# Altium PCB avr32da32_evalboard.PcbDoc
Units mil, origin at the board's own origin, x right, y up, seen from the top; angles counter-clockwise.
Board outline 1275 x 2985 mil, 2 copper layers (Top Layer, Bottom Layer); 39 components, 52 nets, 199 pads, 18 vias.
Unrouted connection lines stored in the file: 6.
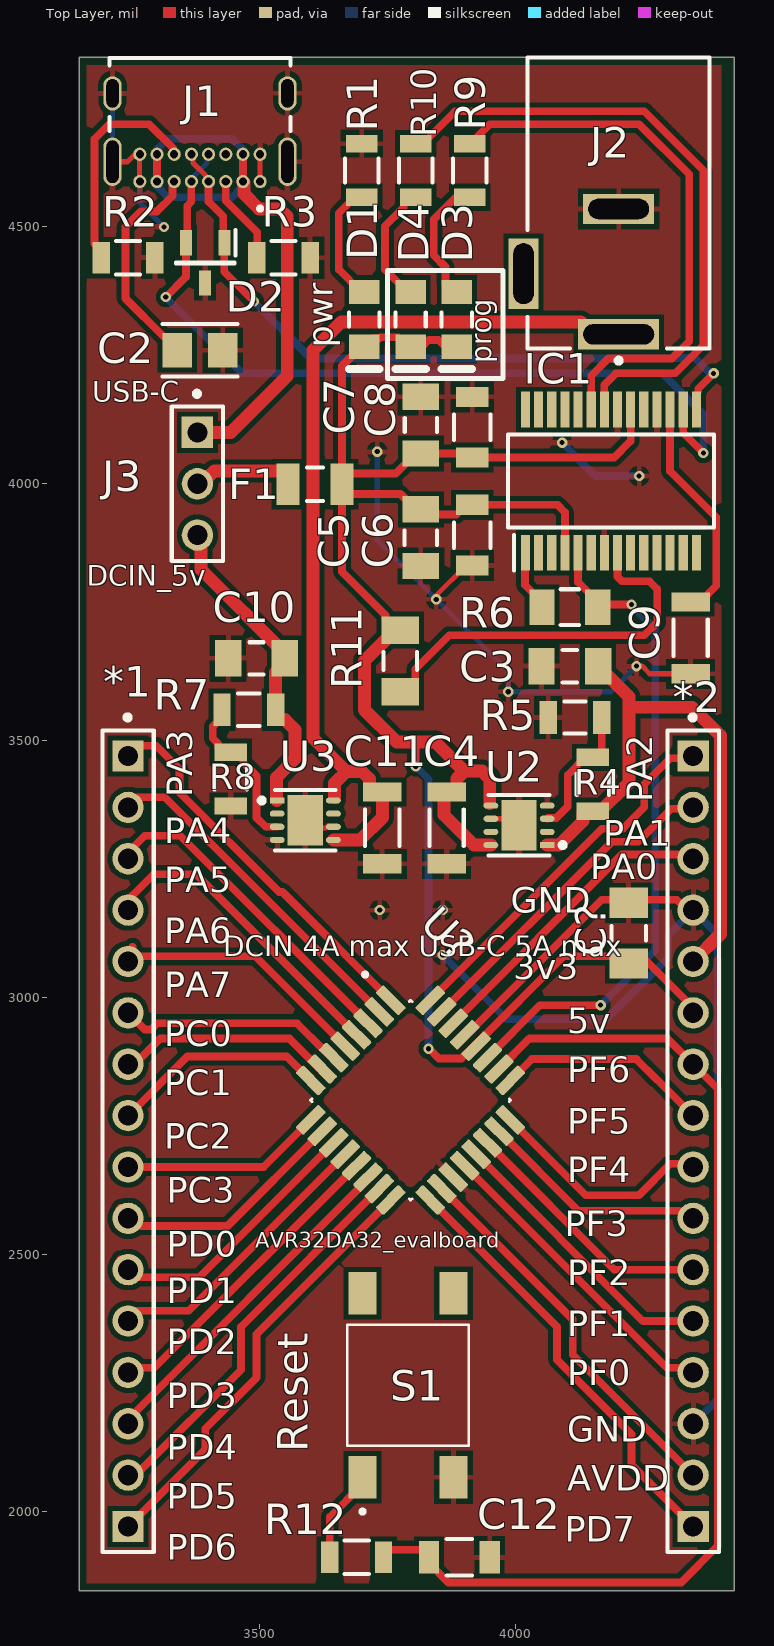
[diagram p0: Top Layer view]
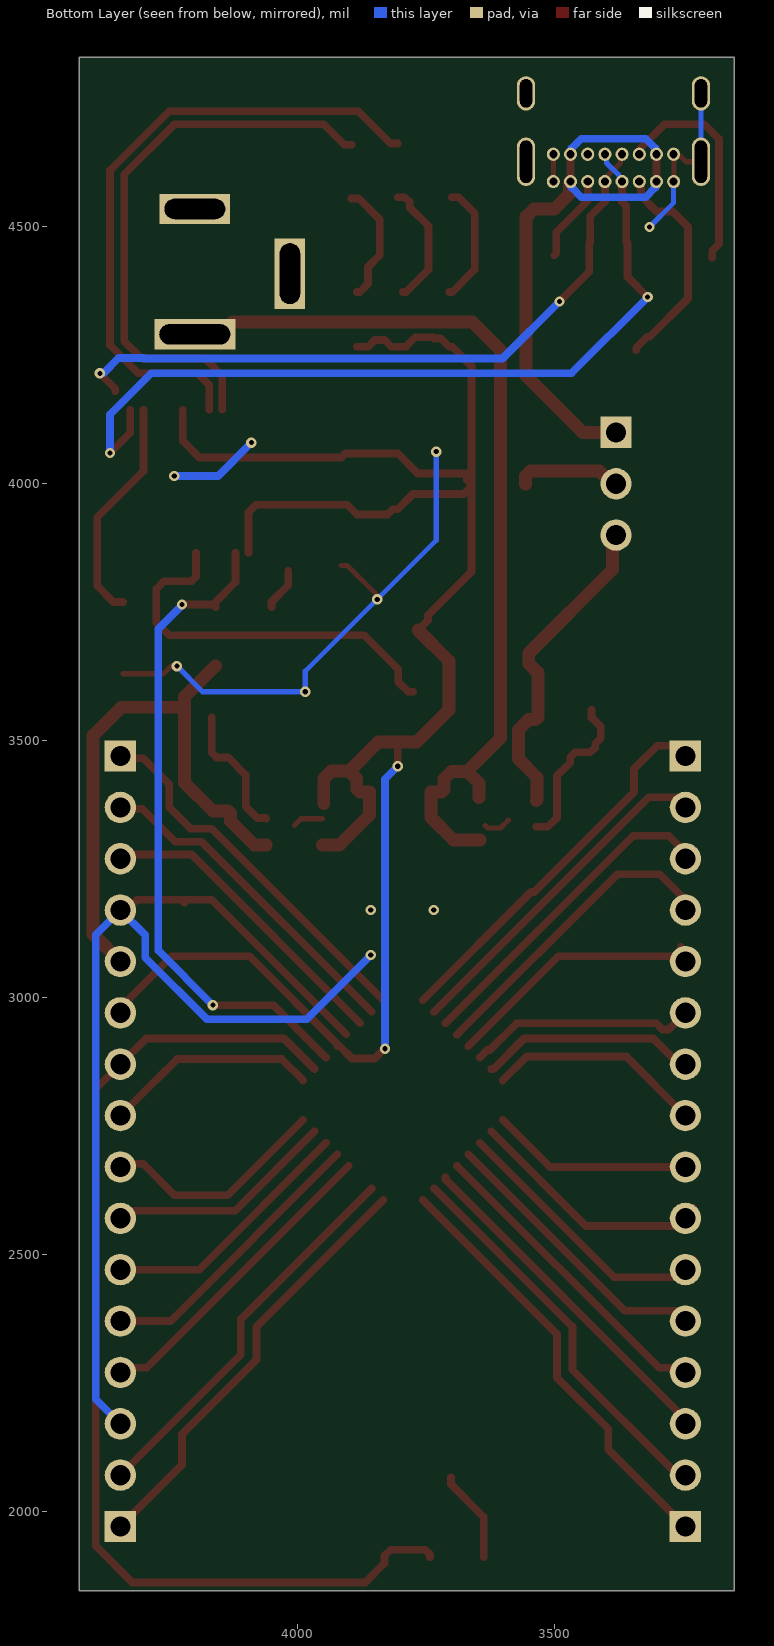
[diagram p1: Bottom Layer view, seen from below]

## Layer stack, top to bottom
Top Solder: solder mask 0.4, Solder Resist, Dk 3.5
Top Layer: signal copper 1.4
Dielectric 1: dielectric 12.6, FR-4, Dk 4.8
Bottom Layer: signal copper 1.4
Bottom Solder: solder mask 0.4, Solder Resist, Dk 3.5

## Board outline
3150,1845 4425,1845 4425,4830 3150,4830

## Design rules (kind name [scope] priority, off if disabled: settings)
Clearance [All] p1: gap=10 ignorepadtopadclearanceinfootprint=FALSE
PolygonConnect [All] p1: connectstyle=Relief reliefconductorwidth=10 reliefentries=4 polygonreliefangle="90 Angle" airgapwidth=10
RoutingVias [All] p1: holewidth=28 width=50 viastyle="Through Hole" minholewidth=28 minwidth=50 maxholewidth=28 maxwidth=50
SolderMaskExpansion [All] p1: expansion=4 istentingtop=FALSE
SupplyNets "Schematic Supply Nets_5" [InNet('VIN')] p1: voltage=0.000
SupplyNets "Schematic Supply Nets_4" [InNet('+5')] p2: voltage=0.000
SupplyNets "Schematic Supply Nets_3" [InNet('+3v3')] p3: voltage=0.000
SupplyNets "Schematic Supply Nets_2" [InNet('VBUS')] p4: voltage=0.000
SupplyNets "Schematic Supply Nets_1" [InNet('VCC')] p5: voltage=0.000
SupplyNets "Schematic Supply Nets" [InNet('GND')] p6: voltage=0.000
Width [All] p1: maxlimit=25 minlimit=10 preferedwidth=15 minimp=50.000000 maximp=50.000000 favimp=50.000000
30 further rules are at their usual default settings.

## Components (designator, comment, footprint, x,y, rotation, side; value= is the part's Value field where it differs from the comment)
*1 "Custom Connector_16" "Custom Connector_16" 3245,2770 r270 top
*2 "Custom Connector_16" "Custom Connector_16" 4345,2770 r270 top
C2 "10nF" FP-GR331B-0_2-IPC_C 3385,4260 r0 top
C3 "Capacitor 10 uF +/- 10% 16 V 1206" CAPC3216X180X50NL20T25 4105,3645 r180 top value=10µF
C4 "Capacitor 1 uF +/- 10% 25 V 1206" CAPC3216X180X20ML20 3865,3330 r90 top value=1µF
C5 "Capacitor 10 uF +/- 10% 16 V 1206" CAPC3216X180X50NL20T25 3815,3895 r270 top value=10µF
C6 "100nF" FP-1206-L_3_2_0_2-W_1_6_0-MFG 3915,3900 r270 top
C7 "Capacitor 10 uF +/- 10% 16 V 1206" CAPC3216X180X50NL20T25 3815.12,4114.15 r90 top value=10µF
C8 "100nF" FP-1206-L_3_2_0_2-W_1_6_0-MFG 3915,4110 r90 top
C9 "Capacitor 1 uF +/- 10% 25 V 1206" CAPC3216X180X20ML20 4340,3700 r270 top value=1µF
C10 "Capacitor 10 uF +/- 10% 16 V 1206" CAPC3216X180X50NL20T25 3495,3660 r180 top value=10µF
C11 "Capacitor 1 uF +/- 10% 25 V 1206" CAPC3216X180X20ML20 3740,3330 r90 top value=1µF
C12 "100nF" FP-1206-L_3_2_0_2-W_1_6_0-MFG 3890,1910 r0 top
C? "Capacitor 10 uF +/- 10% 16 V 1206" CAPC3216X180X50ML20T25 4220,3125 r270 top value=100nF (schematic designator C1)
D1 "SMLLX1206ICTR" LUMX-SML-LX1206IC_V 3705,4320 r270 top
D2 "CDSOT23-SM712" SOT95P230X117-3N 3395,4430 r270 top
D3 "SMLLX1206ICTR" LUMX-SML-LX1206IC_V 3885,4320 r270 top
D4 "SMLLX1206ICTR" LUMX-SML-LX1206IC_V 3795,4320 r270 top
F1 "0466001.NR" FP-0466-MFG 3608.98,3998.98 r0 top
IC1 "CY7C65213-28PVXI" SOP65P780X200-28N 4185,4005 r90 top
J1 "USB4085-GF-A_REVB" GCT_USB4085-GF-A_REVB 3385,4760 r180 top
J2 "PJ-002A" CUI-PJ-002A_V 4200,4409.02 r90 top
J3 "90120-0763" FP-90120-0763-MFG 3380,4000 r270 top
R1 "CR1206-JW-151ELF" FP-CR1206-IPC_C 3700,4610 r270 top value=150
R2 "CR1206-JW-151ELF" FP-CR1206-IPC_C 3245,4440 r0 top value=5.1k
R3 "CR1206-JW-151ELF" FP-CR1206-IPC_C 3547.76,4440 r0 top value=5.1k
R4 "RT1206DRD07499KL" FP-RT1206-IPC_C 4150,3415 r270 top value=499k
R5 "RT1206FRE07160KL" FP-RT1206-IPC_C 4115,3545 r0 top value=160k
R6 "MCA1206MD1001BP100" FP-MCA1206-IPC_B 4105,3760 r0 top value=1k
R7 "RT1206DRD07499KL" FP-RT1206-IPC_C 3480,3560 r0 top value=835k
R8 "RT1206FRE07160KL" FP-RT1206-IPC_C 3445,3425 r90 top value=160k
R9 "CR1206-JW-151ELF" FP-CR1206-IPC_C 3910,4610 r270 top value=150
R10 "CR1206-JW-151ELF" FP-CR1206-IPC_C 3805,4610 r270 top value=150
R11 "Resistor 10k +/-1% 1206 250 mW" RESC3216X60X45ML15T20 3775,3655 r90 top value=10k
R12 "CR1206-JW-151ELF" FP-CR1206-IPC_C 3690,1910 r180 top value=150
S1 "TS04-66-43-BK-100-SMT" SW_TS04-66-43-BK-100-SMT 3790,2245 r90 top
U2 "TLV76601QWDRBRQ1" FP-DRB0008J-IPC_C 4006.13,3335.04 r180 top
U3 "TLV76601QWDRBRQ1" FP-DRB0008J-IPC_C 3590,3345 r0 top
U? "AVR32DA32-I/PT" QFP80P900X900X120-32N 3795,2800 r315 top

## Footprints (in the part's own frame and the unit in brackets; to place one, negate y for a bottom-side part, rotate by r counter-clockwise, add the part's x,y. Pads: shape width x height; smd on the part's side, far side on the other; paste and mask are expansions set on the pad)
CAPC3216X180X20ML20 [mm] "Chip Capacitor, 2-Leads, Body 3.40x1.80mm, IPC Low Density"
  rect 0.95x1.9 smd: 1(-1.775,0) 2(1.775,0)
  silkscreen extent -0.9,-0.85 0.9,0.85, body extent -1.7,-0.9 1.7,0.9, height 1.8
CAPC3216X180X50ML20T25 [mm] "Chip Capacitor, 2-Leads, Body 3.40x1.80mm, IPC Low Density"
  rect 1.5x1.9 smd: 1(-1.5,0) 2(1.5,0)
  silkscreen extent -0.35,-0.85 0.35,0.85, body extent -1.7,-0.9 1.7,0.9, height 1.8
CAPC3216X180X50NL20T25 [mm] "Chip Capacitor, 2-Leads, Body 3.40x1.80mm, IPC Medium Density"
  rect 1.3x1.8 smd: 1(-1.4,0) 2(1.4,0)
  silkscreen extent -0.35,-0.8 0.35,0.8, body extent -1.7,-0.9 1.7,0.9, height 1.8
CUI-PJ-002A_V [mm] "THD, 3-Leads, Body 14.4x9mm, Height 11mm"
  rect 1.5x4 hole 1 slot 3.5 at 90 deg: 1(-3,0)
  rect 1.5x3.5 hole 1 slot 3 at 90 deg: 2(3.2,0)
  rect 3.5x1.5 hole 1 slot 3 at 0 deg: 3(0,4.7)
  silkscreen extent -4.42,-4.5 10.7,4.5, body extent -3.7,-4.5 10.7,4.9, height 11
"Custom Connector_16" [mm]
  rect 1.55x1.55 hole 1 paste-2539.97 mask+0: 1(-17.78,0) 16(20.32,0)
  round 1.55 hole 1 paste-2539.97 mask+0: 2(-15.24,0) 3(-12.7,0) 5(-7.62,0) 6(-5.08,0) 7(-2.54,0) 8(0,0) 9(2.54,0) 11(7.62,0) 12(10.16,0) 13(12.7,0) 14(15.24,0) 15(17.78,0)
  round 1.55 hole 1 paste-2539.97 mask-2539.97: 4(-10.16,0) 10(5.08,0)
  silkscreen extent -19.81,-1.27 21.59,1.27, body extent -19.15,-1.37 19.15,1.37, height 0.25
FP-0466-MFG [mil]
  rect 45x80 smd paste+0 mask+0: 1(-52.5,0) 2(52.5,0)
  silkscreen extent -15,-32 15,32, body extent -79,-44 79,44, height 10
FP-1206-L_3_2_0_2-W_1_6_0-MFG [mm]
  rect 1x1.6 smd paste+0 mask+0: 1(-1.5,0) 2(1.5,0)
  silkscreen extent -0.63,-0.9 0.63,0.9, body extent -2.1,-1 2.1,1, height 0.25
FP-90120-0763-MFG [mm]
  rect 1.55x1.55 hole 1 paste-2539.97 mask+0: 1(-2.54,0)
  round 1.55 hole 1 paste-2539.97 mask+0: 2(0,0) 3(2.54,0)
  silkscreen extent -4.57,-1.27 3.81,1.27, body extent -3.91,-1.37 3.91,1.37, height 0.25
FP-CR1206-IPC_C [mil]
  rect 33.79x61.5 smd paste+0 mask+0: 1(-52.24,0) 2(52.24,0)
  silkscreen extent -24,-32 24,32, body extent -73,-36 73,36, height 10
FP-DRB0008J-IPC_C [mm]
  rect 0.731x0.302 smd paste+0 mask+0: 1(-1.391,0.975)
  rrect100% 0.731x0.302 smd paste+0 mask+0: 2(-1.391,0.325) 3(-1.391,-0.325) 4(-1.391,-0.975) 5(1.391,-0.975) 6(1.391,-0.325) 7(1.391,0.325) 8(1.391,0.975)
  rect 1.75x2.5 smd paste-1000 mask+0: 9(0,0)
  silkscreen extent -2.28,-1.5 1.5,1.5, body extent -1.86,-1.6 1.86,1.6, height 0.25
FP-GR331B-0_2-IPC_C [mil]
  rect 57.25x67.17 smd paste+0 mask+0: 1(-44.33,0) 2(44.33,0)
  silkscreen extent -73,-51 73,51, body extent -77,-39 77,39, height 10
FP-MCA1206-IPC_B [mil]
  rect 49.44x69.22 smd paste+0 mask+0: 1(-54.18,0) 2(54.18,0)
  silkscreen extent -18,-35 18,35, body extent -89,-44 89,44, height 10
FP-RT1206-IPC_C [mil]
  rect 33.79x63.47 smd paste+0 mask+0: 1(-52.24,0) 2(52.24,0)
  silkscreen extent -21,-31 21,31, body extent -73,-37 73,37, height 10
GCT_USB4085-GF-A_REVB [mm]
  round 0.65 hole 0.4: A1(-2.975,4.36) A4(-2.125,4.36) A5(-1.275,4.36) A6(-0.425,4.36) A7(0.425,4.36) A8(1.275,4.36) A9(2.125,4.36) A12(2.975,4.36) B1(2.975,3.01) B4(2.125,3.01) B5(1.275,3.01) B6(0.425,3.01) B7(-0.425,3.01) B8(-1.275,3.01) B9(-2.125,3.01) B12(-2.975,3.01)
  oval 0.9x1.7 hole 0.6 slot 1.4 at 90 deg: S1(-4.325,0) S2(4.325,0)
  oval 0.9x2.4 hole 0.6 slot 2.1 at 90 deg: S3(-4.325,3.38) S4(4.325,3.38)
  silkscreen extent -4.47,-1.74 4.47,5.8, body extent -4.47,-4.25 4.47,4.92, height 3.46
LUMX-SML-LX1206IC_V [mm] "SMD, 2-Leads, Body 3.2x1.5mm"
  rect 1.2x1.5 smd: 1(-1.35,0) 2(1.35,0)
  silkscreen extent -0.35,-0.75 2.45,0.75, body extent -1.6,-0.8 1.6,0.8, height 1.1
QFP80P900X900X120-32N [mm]
  rrect25% 1.6x0.55 smd: 1(-4.18,2.8) 2(-4.18,2) 3(-4.18,1.2) 4(-4.18,0.4) 5(-4.18,-0.4) 6(-4.18,-1.2) 7(-4.18,-2) 8(-4.18,-2.8) 17(4.18,-2.8) 18(4.18,-2) 19(4.18,-1.2) 20(4.18,-0.4) 21(4.18,0.4) 22(4.18,1.2) 23(4.18,2) 24(4.18,2.8)
  rrect25% 0.55x1.6 smd: 9(-2.8,-4.18) 10(-2,-4.18) 11(-1.2,-4.18) 12(-0.4,-4.18) 13(0.4,-4.18) 14(1.2,-4.18) 15(2,-4.18) 16(2.8,-4.18) 25(2.8,4.18) 26(2,4.18) 27(1.2,4.18) 28(0.4,4.18) 29(-0.4,4.18) 30(-1.2,4.18) 31(-2,4.18) 32(-2.8,4.18)
  silkscreen extent -6.08,-3.5 3.5,3.5, body extent -4.5,-4.5 4.5,4.5, height 1.2
RESC3216X60X45ML15T20 [mm] "Chip Resistor, 2-Leads, Body 3.3x1.75mm, IPC Low Density"
  rect 1.35x1.85 smd: 1(-1.525,0) 2(1.525,0)
  silkscreen extent -0.45,-0.82 0.45,0.82, body extent -1.65,-0.87 1.65,0.87, height 0.6
SOP65P780X200-28N [mm]
  rect 1.775x0.45 smd: 1(-3.538,4.225) 2(-3.538,3.575) 3(-3.538,2.925) 4(-3.538,2.275) 5(-3.538,1.625) 6(-3.538,0.975) 7(-3.538,0.325) 8(-3.538,-0.325) 9(-3.538,-0.975) 10(-3.538,-1.625) 11(-3.538,-2.275) 12(-3.538,-2.925) 13(-3.538,-3.575) 14(-3.538,-4.225) 15(3.538,-4.225) 16(3.538,-3.575) 17(3.538,-2.925) 18(3.538,-2.275) 19(3.538,-1.625) 20(3.538,-0.975) 21(3.538,-0.325) 22(3.538,0.325) 23(3.538,0.975) 24(3.538,1.625) 25(3.538,2.275) 26(3.538,2.925) 27(3.538,3.575) 28(3.538,4.225)
  silkscreen extent -4.43,-5.1 2.3,5.1, body extent -3.9,-5.1 3.9,5.1, height 2
SOT95P230X117-3N [mm]
  rect 1.25x0.6 smd: 1(-1,0.95) 2(-1,-0.95) 3(1,0)
  silkscreen extent -1.63,-1.45 0.03,1.5, body extent -1.15,-1.45 1.15,1.45, height 1.17
SW_TS04-66-43-BK-100-SMT [mm]
  rect 2.1x1.4 smd: 1(-4.55,2.25) 2(-4.55,-2.25) 3(4.55,2.25) 4(4.55,-2.25)
  silkscreen extent -6.35,-3 3,3, body extent -5,-3 5,3, height 4.3

## Part data
C2: library part CMP-06035-062347-1, "CAP CER 10000PF 630V X7T 1206", Case Code (Imperial)=1206, Case Code (Metric)=3216, Dielectric=X7T, Max Operating Temperature=125°C, Min Operating Temperature=-55°C, Package Quantity=1, Tolerance=10%, Voltage Rating=630V, Capacitance=10nF, Case/Package=1206, Construction=Flat, Depth=1.6mm, Height=1.25mm, Length=3.2mm, Mount="Surface Mount", Packaging="Tape and Reel", Radiation Hardening=No, REACH SVHC="No SVHC", RoHS Compliant=Yes, Series=GR3, Termination=SMD/SMT, Thickness=0.049inch, Voltage Rating (DC)=630V, Width=0.063inch
C3 C5 C7 C10 C?: library part CMP-001-00016-6, "Chip Capacitor, 10 uF, +/- 10%, 16 V, 1206 (3216 Metric)", Capacitor Type=Ceramic, Case/Package=1206, Max Operating Temperature=125°C, Min Operating Temperature=-55°C, Tolerance=10%, Voltage Rating=16V, Mounting Technology=SM, Pins=2, RoHS Compliant=True
C4 C9 C11: library part CMP-001-00006-6, "Chip Capacitor, 1 uF, +/- 10%, 25 V, 1206 (3216 Metric)", Capacitor Type=Ceramic, Case/Package=1206, Max Operating Temperature=125°C, Min Operating Temperature=-55°C, Tolerance=10%, Voltage Rating=25V, Mounting Technology=SM, Pins=2, RoHS Compliant=True
C6 C8 C12: library part CMP-2000-05018-2, "General Purpose Ceramic Capacitor, 1206, 100nF, 10%, X7R, 15%, 50V", Case Code (Imperial)=1206, Case Code (Metric)=3216, Dielectric=X7R, Dielectric Material=Ceramic, Insulation Resistance=100GR, Max Operating Temperature=125°C, Min Operating Temperature=-55°C, Package Quantity=1, Tolerance=10%, Voltage=50V, Capacitance=100nF, Case/Package=1206, Construction=Flat, Contact Plating=Tin, Depth=1.6mm, Dissipation Factor=2.5%, Height=0.94mm, Lead Free="Lead Free", Length=3.2mm, Mount="Surface Mount", Number of Pins=2, Packaging="Tape and Reel", Radiation Hardening=No, REACH SVHC="No SVHC", RoHS Compliant=Yes, Series=-, Termination=SMD/SMT, Thickness=0.037inch, Voltage Rating=50V, Voltage Rating (DC)=50V, Width=1.6mm
D1 D3 D4: library part CMP-007-00044-1, "LED Uni-Color Red 635nm 2-Pin T/R"
D2: "Diode", Manufacturer_Name=Bourns, Mouser Part Number=652-CDSOT23-SM712, Arrow Part Number=CDSOT23-SM712, Arrow Price/Stock=https://www.arrow.com/en/products/cdsot23-sm712/bourns?utm_currency=USD&region=europe, Datasheet Link=http://uk.rs-online.com/web/p/products/7673728, Height=1.17mm, Manufacturer_Part_Number=CDSOT23-SM712, Mouser Price/Stock=https://www.mouser.co.uk/ProductDetail/Bourns/CDSOT23-SM712?qs=FuI%252BOVLl4%2FLTY%2FGQ265RLA%3D%3D
F1: library part CMP-005-00014-1, "Electric Fuse, Very Fast Blow, 1A, 63VAC, 63VDC, 50A (IR), Surface Mount, 1206", Current Rating=1A, Max Operating Temperature=90°C, Min Operating Temperature=-55°C, Mounting Technology="Surface Mount", RoHS Compliant=Yes
IC1: "Integrated Circuit", Manufacturer_Name=Infineon, Mouser Part Number=727-CY7C65213-28PVXI, Arrow Part Number=CY7C65213-28PVXI, Arrow Price/Stock=https://www.arrow.com/en/products/cy7c65213-28pvxi/cypress-semiconductor?region=nac, Datasheet Link=http://www.mouser.com/datasheet/2/100/001-81011_CY7C65213_USB-UART_LP_Bridge_Controller_-348826.pdf, Height=2mm, Manufacturer_Part_Number=CY7C65213-28PVXI, Mouser Price/Stock=https://www.mouser.co.uk/ProductDetail/Infineon-Technologies/CY7C65213-28PVXI?qs=dOK1vf2izjvExqwVZ7qYig%3D%3D
J1: library part CMP-012-000000-1, "USB-C (USB TYPE-C) USB 2.0 æ’åº§è¿žæŽ¥å™¨ 24 (16+8 Dummy) ä½é€šå­”ã€ç›´è§’ã€ä½Žæˆæœ¬ã€3.46mm å¤–å½¢ã€16 é’ˆã€æ°´å¹³ã€é¡¶éƒ¨å®‰è£…", Package=None, Check_prices=https://www.snapeda.com/parts/USB4085-GF-A/Global+Connector+Technology/view-part/?ref=eda, Component Type=Standard, Design Item ID=USB4085-GF-A_REVB, MF="Global Connector Technology", MP=USB4085-GF-A, Pin Count=20, SnapEDA_Link=https://www.snapeda.com/parts/USB4085-GF-A/Global+Connector+Technology/view-part/?ref=snap, Source=USB4085-GF-A_REVB.SchLib
J2: library part CMP-002-00078-1, "12V, 1A, 2mm Dia", Voltage Rating=12V, Connector Type=Circular,Power, Mounting Technology=Board, RoHS Compliant=Yes
J3: library part CMP-002-00075-2, "Board Connector, 3 Contact(s), 1 Row(s), Male, Straight, 0.1 inch Pitch, Solder Terminal, Black Insulator, Receptacle", Max Operating Temperature=125°C, Min Operating Temperature=-55°C, Connector Type="BOARD CONNECTOR", Mounting Technology=Board, RoHS Compliant=Yes
R1 R2 R3 R9 R10 R12: library part CMP-009-00182-1, "Fixed Resistor, Metal Glaze/thick Film, 0.25W, 150ohm, 200V, 5% +/-Tol, 200ppm/Cel, Surface Mount, 1206", Case/Package=1206, Max Operating Temperature=155°C, Min Operating Temperature=-55°C, Power=250mW, Tolerance=5%, Mounting Technology="Surface Mount", Pins=2, RoHS Compliant=Yes
R4 R7: library part CMP-009-00185-1, "Fixed Resistor, Thin Film, 0.25W, 499000ohm, 200V, 0.5% +/-Tol, 25ppm/Cel, Surface Mount, 1206", Case/Package=1206, Max Operating Temperature=155°C, Min Operating Temperature=-55°C, Power=250mW, Tolerance=0.5%, Mounting Technology="Surface Mount", Pins=2, RoHS Compliant=Yes
R5 R8: library part CMP-009-00184-1, "Fixed Resistor, Thin Film, 0.25W, 160000ohm, 200V, 1% +/-Tol, 50ppm/Cel, Surface Mount, 1206", Case/Package=1206, Max Operating Temperature=155°C, Min Operating Temperature=-55°C, Power=250mW, Tolerance=1%, Mounting Technology="Surface Mount", Pins=2, RoHS Compliant=Yes
R6: library part CMP-009-00186-1, "Fixed Resistor, Thin Film, 0.25W, 1000ohm, 200V, 0.1% +/-Tol, 25ppm/Cel, Surface Mount, 1206", Case/Package=1206, Max Operating Temperature=155°C, Min Operating Temperature=-55°C, Power=400mW, Tolerance=0.1%, Pins=2, RoHS Compliant=Yes
R11: library part CMP-009-00016-5, "Chip Resistor, 10 KOhm, +/- 1%, 0.25 W, -55 to 155 degC, 1206 (3216 Metric)", Case/Package=1206, Max Operating Temperature=155°C, Min Operating Temperature=-55°C, Power=250mW, Tolerance=1%, Voltage Rating=200V, Mounting Technology=SM, Pins=2, RoHS Compliant=True
S1: library part CMP-014-000000-2, "Tactile Switches 6 x 6 mm, 4.3 mm Act Height, 100 gf, Black, Surface Mount, SPST,", Package=None, Availability=Unavailable, Component Type=Standard, Design Item ID=TS04-66-43-BK-100-SMT, MP=TS04-66-43-BK-100-SMT, Pin Count=4, Price=None, Source=TS04-66-43-BK-100-SMT.SchLib
U2 U3: library part CMP-019-00049-1, "Adjustable Positive LDO Regulator, 0.8V Min, 14.6V Max, 0.75V Dropout, PDSO8"
U?: library part CMP-031-00006-3, "RISC Microcontroller, 8-Bit, FLASH, AVR CPU, 24MHz, CMOS, PQFP32", Case/Package=TQFP32, Max Supply Voltage=5.5V, Mfr_Name=Microchip, Min Supply Voltage=1.8V, ComponentLink1Description=https://www.digikey.ro/ro/products/detail/microchip-technology/AVR32DA32-I-PT/12396890, Design Item ID=AVR32DA32-IPT, Mounting Technology=SMD, RefDes=RefDes, RoHS Compliant=Yes, Source=AVR32DA32-IPT.SchLib, Type=Type

## Via types
v1: diameter 20, hole 10, Top Layer to Bottom Layer, 18 vias

## Nets (pads, with @x,y where several pads share a name; then routed paths per layer and width w, separated by ;. In a path a pad name is that pad's centre, name@x,y a point inside that pad or via, vN(x,y) a via of type N, cw(c..) or ccw(c..) an arc to the next point about the centre after c; other vN are vias at no path point)
+3v3: *2.5 C3.1 R4.2 U2.1 | length 1132.7
  Top Layer w25: U2.1 4083.9,3296.66 4130.77,3343.52 4130.77,3358.36 4135.16,3362.76 R4.2 4164.84,3362.76 4220,3417.91 4220,3565 ; C3.1@4160.12,3645.16 4220,3585.28 4220,3565 ; *2.5 4398.01,3123.01 4398.01,3509.83 4342.84,3565 4220,3565
+5: C10.1 J3.3 R7.2 U3.1 | length 633.8
  Top Layer w25: J3.3 3386.89,3893.11 3386.89,3833.07 3550.12,3669.84 C10.1 3550.12,3650.16 3532.24,3632.28 R7.2 3532.24,3545.16 3536.64,3540.77 3550.36,3540.77 3570,3521.12 3570,3464.54 3533.75,3428.29 3533.75,3384.89 U3.1
GND: *2.4 *2.14 C2.2 C3.2 C4.1 C5.2 C6.2 C7.2 C8.2 C9.2 C10.2 C11.1 C12.2 C?.1 D2.3 IC1.7 IC1.18 IC1.21 J1.A1 J1.A12 J1.B1 J1.B12 J1.S1 J1.S2 J1.S3 J1.S4 J2.2 R1.1 R2.2 R3.2 R5.1 R8.1 S1.2 U2.4 U2.6 U2.9 U3.4 U3.6 U3.9 U?.19 U?.29 | length 4023
  Top Layer w10: J1.S4 3244.04,4626.93 3255.63,4638.51 3264.89,4638.51 J1.B1 ; J1.A12@3267.46,4588.76 J1.B1@3267.46,4641.08 ; J1.A1 J1.B12 ; U3.9 3605,3330 3630,3330 U3.6@3635,3335 ; v1(3845,3775) 3845,3782.76 3903.19,3840.94 C6.2 ; U2.6 3993.33,3347.84 U2.9 ; v1(4235,3645) 4245.82,3645 4260.71,3630.12 C9.2
  Top Layer w15: U?.29@3905.1,2928.2 3975,2998.1 4166.9,3190 C?.1@4225.94,3190 ; C?.1 C?.1@4225.94,3190 ; *2.14@4336.19,2178.81 *2.14 ; *2.4 4333.2,3170 4313.2,3190 C?.1@4225.94,3190
  Bottom Layer w10: J1.S4 J1.S2 ; J1.A12 3267.87,4547.13 v1(3315,4500) ; v1(3730,4062.5) 3730,3890 v1(3845,3775) 3985,3635 v1(3985,3595) 4185,3595 v1(4235,3645)
  Bottom Layer w15: v1(3857.5,3082.5) 3982.5,2957.5 4176.39,2957.5 4296.52,3077.63 4296.52,3121.52 *2.4 4393.01,3121.99 4393.01,2218.01 *2.14 ; v1(4090,4080) 4155,4015 v1(4240,4015)
  other v1: 3735,3170 3857.5,3170
GPIO5: IC1.8 R11.1 | length 769.5
  Top Layer w15: R11.1 3784.84,3594.96 3803.92,3614.04 3803.92,3638.92 3870,3705 4250,3705 4275,3730 4275,3795 4260,3810 4206.58,3810 4197.8,3818.79 IC1.8
Net*2_7: *2.7 C12.1 R12.1 U?.26 | length 2105.7
  Top Layer w15: R12.1 3742.24,1915.61 3751.64,1925 3818.76,1925 3830.94,1912.81 C12.1 3830.94,1898.19 3868.13,1861 4321.78,1861 4393.01,1932.24 4393.01,2821.99 *2.7 4295,2920 4026.36,2920 U?.26
Net*2_15: *2.15 U?.18 | length 760.6
  Top Layer w15: U?.18 4110.68,2372.96 4110.68,2304.32 *2.15
NetC2_1: C2.1 J1.A8 | length 430.5
  Top Layer w15: J1.A8 3332.78,4586.32 3332.78,4578.83 3331.63,4577.69 3331.63,4560.42 3301.21,4530 3270,4530 3240,4500 3240,4360.67 3314.58,4286.09 3319.54,4286.09 3340.67,4264.96 C2.1
NetC9_1: C9.1 IC1.17 | length 443.3
  Top Layer w15: IC1.17 4300.16,4024.51 4390,3934.67 4390,3801.18 4358.7,3769.88 C9.1
NetD1_1: D1.1 R1.2 | length 235.5
  Top Layer w15: R1.2 3686.14,4557.76 3655,4526.61 3655,4417.24 3699.09,4373.15 D1.1
NetD2_1: D2.1 IC1.15 J1.A6 J1.B6 | length 1337.3
  Top Layer w10: J1.B6 3371.25,4638.51 3371.25,4624.67 3396.06,4599.86 3396.06,4598.23 3401.73,4592.57 J1.A6
  Top Layer w15: J1.A6 3401.73,4548.81 3430,4520.55 D2.1@3430,4469.37 ; D2.1 3432.4,4412.6 v1(3490,4355) ; 4355,4180 4355,4185 v1(4385,4215)
  Bottom Layer w15: v1(3490,4355) 3601.12,4243.88 4298.88,4243.88 4300,4245 4347.82,4245 4377.82,4215 v1(4385,4215)
NetD2_2: D2.2 IC1.16 J1.A7 J1.B7 | length 1627.5
  Top Layer w15: v1(3318.46,4363.42) 3357.6,4402.55 D2.2 ; D2.2@3360,4470.1 3360,4540.55 3368.27,4548.81 J1.A7 ; IC1.16 4325.75,4099.25 v1(4365,4060)
  Bottom Layer w10: J1.A7 3368.27,4592.57 3373.94,4598.23 3373.94,4599.86 3398.75,4624.67 3398.75,4638.51 J1.B7
  Bottom Layer w15: v1(3318.46,4363.42) 3466.88,4215 4285,4215 4365,4135 v1(4365,4060)
NetD3_1: D3.1 R9.2 | length 235.4
  Top Layer w15: D3.1 3879.09,4373.15 3862.97,4389.27 3862.97,4422.03 3840,4445 3840,4514.37 3881.14,4555.51 R9.2@3895,4555.51
NetD4_1: D4.1 R10.2 | length 241.7
  Top Layer w15: D4.1 3789.09,4373.15 3745,4417.24 3745,4501.14 3781.75,4537.89 3781.75,4548.36 3791.14,4557.76 R10.2
NetF1_1: F1.1 J3.2 | length 207
  Top Layer w25: J3.2 3387.66,4000 3412.66,4025 3546.48,4025 3556.48,4015 F1.1
NetIC1_1: IC1.1 R6.1 | length 83.6
  Top Layer w15: 4017.89,3830 4017.89,3802.82 4050.82,3769.89 R6.1
NetIC1_5: IC1.5 R6.2 U?.27 | length 1285.4
  Top Layer w15: U?.27 4046.81,2985 v1(4165,2985) ; IC1.5 4121.02,3808.05 R6.2@4159.18,3769.89 ; R6.2 4164.18,3765 v1(4225,3765)
  Bottom Layer w15: v1(4165,2985) 4271.52,3091.52 4271.52,3717.19 4225,3763.71 v1(4225,3765)
NetJ1_A5: J1.A5 R3.1 | length 170.4
  Top Layer w15: J1.A5 3435.2,4550.7 3496.44,4489.46 3496.44,4449.08 R3.1@3500.51,4445
NetJ1_B5: J1.B5 R2.1 | length 433.5
  Top Layer w15: R2.1 3192.76,4453.86 3179.51,4467.11 3179.51,4671.04 3208.46,4700 3285.68,4700 3332.78,4652.9 3332.78,4643.52 J1.B5
NetR4_1: R4.1 R5.2 U2.3 | length 263.9
  Top Layer w15: U2.3 4062.42,3349.38 4078.44,3349.38 4100.77,3371.71 4100.77,3432.85 4135.16,3467.24 R4.1 4157.85,3467.24 4167.24,3476.64 R5.2
NetR7_1: R7.1 R8.2 U3.3 | length 317.6
  Top Layer w15: R7.1 3427.76,3545.16 3410,3527.4 3410,3504.39 3420.77,3493.63 3420.77,3486.64 3430.16,3477.24 R8.2 3459.84,3477.24 3469.23,3467.85 3469.23,3456.98 3495,3431.21 3495,3350 3512.8,3332.2 U3.3
NetR12_2: R12.2 S1.1 | length 182.2
  Top Layer w15: R12.2 3637.76,1988.43 3701.42,2052.09 S1.1
PA0: *2.3 U?.30 | length 606.6
  Top Layer w15: U?.30 4206.55,3278.36 4336.64,3278.36 *2.3
PA1: *2.2 U?.31 | length 654.2
  Top Layer w15: U?.31 4187.01,3303.36 4238.36,3303.36 4302.52,3367.51 4342.52,3367.51 *2.2
PA2: *2.1 U?.32 | length 735
  Top Layer w15: U?.32 4167.47,3328.36 4208.36,3328.36 4250,3370 4250,3415 4300.77,3465.78 4340.77,3465.78 *2.1
PA3: *1.1 U?.1 | length 756.9
  Top Layer w15: *1.1@3240,3470 3260,3490 3300,3490 3345,3445 3345,3399.38 3539.05,3205.33 3545.57,3205.33 U?.1
PA4: *1.2 U?.2 | length 675.7
  Top Layer w15: *1.2@3240,3370 3260,3390 3316.36,3390 U?.2
PA5: *1.3 U?.3 | length 644.3
  Top Layer w15: *1.3 3245,3282.45 3277.55,3315 3346.81,3315 U?.3
PA6: *1.4 U?.4 | length 606.4
  Top Layer w15: *1.4@3240.04,3185.04 3247.58,3185.04 3253.81,3191.26 3253.81,3198.81 3295,3240 3377.27,3240 U?.4
PA7: *1.5 U?.5 | length 520.6
  Top Layer w15: *1.5@3241.68,3086.68 3249.22,3086.68 3253.81,3091.26 *1.5@3253.81,3098.81 ; *1.5 3257.45,3070 3267.45,3080 3492.73,3080 U?.5
PC0: *1.6 U?.6 | length 447.8
  Top Layer w15: *1.6 3277.34,2937.66 3289.76,2937.66 3302.1,2950 3573.7,2950 3626.02,2897.69 3630.5,2897.69 U?.6 ; *1.6@3250.63,2989.41 *1.6@3251.96,2989.41
PC1: *1.7 U?.7 | length 423.2
  Top Layer w15: *1.7 3257.45,2870 3307.45,2920 3559.16,2920 3618.47,2860.69 U?.7
PC2: *1.8 U?.8 | length 422.6
  Top Layer w15: *1.8 3360,2885 3554.1,2885 U?.8
PC3: *1.9 U?.9 | length 398.6
  Top Layer w5: *1.9@3230,2690 *1.9@3234.97,2690
  Top Layer w15: *1.9 3509.1,2670 U?.9
PD0: *1.10 U?.10 | length 483.8
  Top Layer w15: *1.10@3230,2590 3234.97,2590 3269.97,2555 3438.64,2555 U?.10
PD1: *1.11 U?.11 | length 538.3
  Top Layer w15: *1.11@3230,2490 3234.97,2490 3269.97,2455 3383.19,2455 U?.11
PD2: *1.12 U?.12 | length 570
  Top Layer w15: *1.12@3230,2375 3242.45,2375 3257.45,2390 3362.73,2390 U?.12
PD3: *1.13 U?.13 | length 611.5
  Top Layer w15: *1.13 3253.81,2278.81 3296.08,2278.81 U?.13
PD4: *1.14 U?.14 | length 704.2
  Top Layer w15: *1.14@3230,2175 3237.55,2175 *1.14@3253.81,2191.26 ; *1.14 3245,2178.7 3712.04,2645.74 U?.14
PD5: *1.15 U?.15 | length 782.4
  Top Layer w15: *1.15@3230,2075 3234.99,2079.99 3269.99,2079.99 3465,2275 3465,2358.64 U?.15
PD6: *1.16 U?.16 | length 847.6
  Top Layer w15: *1.16 3395,2120 3395,2160 3495,2260 3495,2344.1 U?.16
PD7: *2.16 U?.17 | length 847.6
  Top Layer w15: U?.17 4080,2359.1 4080,2294.69 4225.08,2149.61 4225.08,2089.92 *2.16
PF0: *2.13 U?.20 | length 611.5
  Top Layer w15: U?.20 4293.92,2278.81 4336.19,2278.81 *2.13
PF1: *2.12 U?.21 | length 557
  Top Layer w15: U?.21 4247.27,2370 *2.12
PF2: *2.11 U?.22 | length 502.6
  Top Layer w15: U?.22 4191.81,2470 *2.11
PF3: *2.10 U?.23 | length 448.1
  Top Layer w15: U?.23 4121.36,2585 4317.55,2585 4332.55,2570 *2.10
PF4: *2.9 U?.24 | length 444.3
  Top Layer w15: U?.24 4135.9,2615 4239.58,2615 4300.77,2676.19 4338.81,2676.19 *2.9
PF5: *2.8 U?.25 | length 418.5
  Top Layer w15: U?.25 4030.9,2880 4234.64,2880 4274.63,2840.02 4274.98,2840.02 *2.8
RXLED: IC1.22 R10.1 | length 1246.6
  Top Layer w15: R10.1 3818.86,4662.24 3881.61,4725 4250,4725 4365,4610 4365,4270 4310,4215 4195,4215 4172.2,4192.2 IC1.22
TXLED: IC1.23 R9.1 | length 1108.7
  Top Layer w15: R9.1@3895,4660 3908.86,4660 3948.86,4700 4239.64,4700 4337.32,4602.32 4337.32,4277.68 4303.52,4243.88 4180,4243.88 4146.61,4210.49 IC1.23
VBUS: J1.A4 J1.A9 J1.B4 J1.B9 J3.1 | length 1174.1
  Top Layer w15: J1.A9 J1.B4 ; J1.B9@3466.64,4643.52 J1.B9 J1.A4
  Top Layer w25: J3.1 3445,4100 3555,4210 3555,4520 3540,4535 3500,4535 3470.49,4564.51 3470.49,4586.52 J1.A4
  Bottom Layer w15: J1.A9 3303.36,4586.32 3303.36,4576.94 3322.25,4558.05 3447.75,4558.05 3466.64,4576.94 3466.64,4586.32 J1.A4 ; J1.B4 3303.36,4643.52 3303.36,4652.9 3322.25,4671.79 3447.75,4671.79 3466.64,4652.9 3466.64,4643.52 J1.B9
VCC: *2.6 C4.2 C5.1 C6.1 C7.1 C8.1 C?.2 D1.2 D3.2 D4.2 F1.2 IC1.4 IC1.20 R11.2 U2.5 U2.8 U?.28 | length 4065.1
  Top Layer w15: F1.2@3670,4020 F1.2@3670,4013.52 ; R11.2@3765.16,3715.04 3746.08,3734.11 3746.08,3743.96 3661.48,3828.56 F1.2@3661.48,3995 ; D4.2@3789.09,4266.85 3770.94,4285 3735.81,4285 3733.79,4282.97 3721.12,4282.97 D1.2 3699.09,4266.85 3661.48,4229.23 F1.2 ; D4.2 3817.5,4266.85 3830.65,4280 3849.35,4280 3862.5,4266.85 D3.2 ; v1(3805,3450) 3805,3492.06 3810,3497.06 ; v1(3830,2900) 3831.35,2900 3850.16,2881.2 3893.99,2881.2 3918.02,2905.23 U?.28 3922.5,2909.41 4093.1,3080 4245,3080 4345,2980 *2.6 ; IC1.4 4095.43,3944.57 4080.94,3959.06 C6.1 3903.19,3959.06 3884.13,3940 3825.12,3940 C5.1 3805.16,3950.12 3775.28,3980 3676.48,3980 F1.2@3661.48,3995 ; IC1.20 4223.39,4083.39 4190.94,4050.94 C8.1 3906.91,4059.03 C7.1 3805.28,4059.03 3766.24,4020 3676.48,4020 F1.2@3670,4013.52 ; F1.2@3661.48,3995 F1.2 ; F1.2 3670,4007.51 F1.2@3670,4013.52
  Top Layer w25: R11.2@3765.16,3715.04 3705,3654.88 3705,3560 3767.94,3497.06 3810,3497.06 3842.98,3497.06 3899.55,3440.5 ; U2.5@3949.18,3377.57 3949.18,3425.85 3934.53,3440.5 3899.55,3440.5 ; U2.8 3918.34,3296.66 3860,3355 3860,3399.88 3878.7,3399.88 3884.9,3406.08 3884.9,3425.85 3899.55,3440.5
  Bottom Layer w15: v1(3805,3450) 3830,3425 v1(3830,2900)
VIN: C11.2 J2.1 U3.5 U3.8 | length 1797
  Top Layer w25: U3.5 3696.61,3306.61 3740,3350 C11.2 3719.64,3399.88 3715.1,3404.43 3715.1,3425.36 3700.45,3440 3670,3440 ; U3.8@3646.95,3389.19 3646.95,3416.95 3670,3440 ; J2.1 4150.79,4290.91 4126.69,4315 3660,4315 3605,4260 3605,3505 3670,3440
pads on no net: IC1.2 IC1.3 IC1.6 IC1.9 IC1.10 IC1.11 IC1.12 IC1.13 IC1.14 IC1.19 IC1.24 IC1.25 IC1.26 IC1.27 IC1.28 J1.B8 J2.3 S1.3 S1.4 U2.2 U2.7 U3.2 U3.7

## Polygon pours and split planes (outlines as drawn)
GND on Top Layer "NONET_L-01_P-001" (solid, pour order 1): 3165,4815 3165,1860 4410,1860 4400,1870 4400,4815

## Silkscreen, mask and mechanical layers (free items; w line width, h text height)
Top Overlay:
  lines w10: 3750,4205 3750,4210 3750,4415 3975,4415 3975,4205 3960,4205 3750,4205
  text "pwr" at 3643.34,4265 h50 r90
  text "prog" at 3951.67,4235 h40 r90
  text "USB-C" at 3175,4160 h40
  text "DCIN_5v" at 3165,3801.66 h40
  text "PA3" at 3370,3390 h50 r90
  text "PA2" at 4265,3380 h50 r90
  text "PA4" at 3315,3300 h50
  text "PA1" at 4170,3295 h50
  text "PA0" at 4145,3230 h50
  text "PA5" at 3315,3205 h50
  text "GND" at 3990,3165 h50
  text "PA6" at 3315,3105 h50
  text "DCIN 4A max USB-C 5A max" at 3430,3080 h40
  text "3v3" at 3995,3035 h50
  text "PA7" at 3315,3000 h50
  text "5v" at 4100,2930 h50
  text "PC0" at 3315,2905 h50
  text "PF6" at 4100,2835 h50
  text "PC1" at 3315,2810 h50
  text "PF5" at 4100,2735 h50
  text "PC2" at 3315,2705 h50
  text "PF4" at 4100,2640 h50
  text "PC3" at 3320,2600 h50
  text "PF3" at 4095,2535 h50
  text "AVR32DA32_evalboard" at 3493,2513 h30
  text "PD0" at 3320,2495 h50
  text "PF2" at 4100,2440 h50
  text "PD1" at 3320,2405 h50
  text "PF1" at 4100,2340 h50
  text "PD2" at 3320,2305 h50
  text "PF0" at 4100,2245 h50
  text "PD3" at 3320,2200 h50
  text "GND" at 4100,2135 h50
  text "Reset" at 3595,2115 h60 r90
  text "PD4" at 3320,2100 h50
  text "AVDD" at 4100,2040 h50
  text "PD5" at 3320,2005 h50
  text "PD7" at 4095,1940 h50
  text "PD6" at 3320,1905 h50

## Text inside footprints (layer, text, board x,y; h text height)
J1: Mechanical 13 "PCB EDGE" at 3175.75,4821.81 h32 r180